# Altium PCB ProgrammingAdapter.PcbDoc
Units mm, origin at the board's own origin, x right, y up, seen from the top; angles counter-clockwise.
Board outline 16.2 x 7.93 mm, 4 copper layers (Top Layer, Layer 1, Layer 2, Bottom Layer), stack 1.683 mm thick; 4 components, 4 nets, 18 pads, 1 vias.
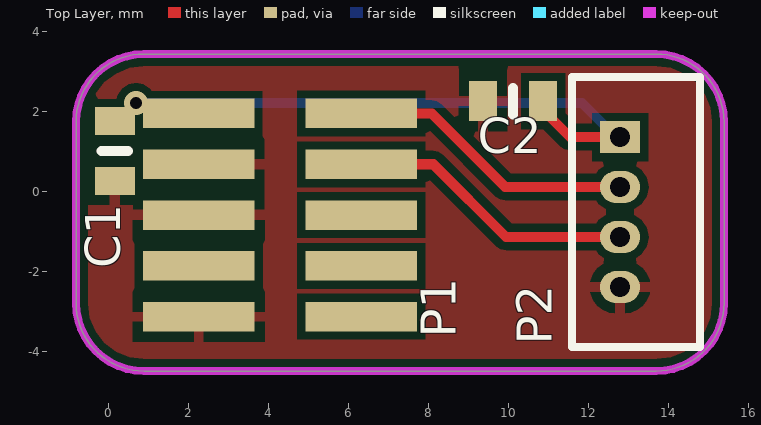
[diagram p0: Top Layer view]
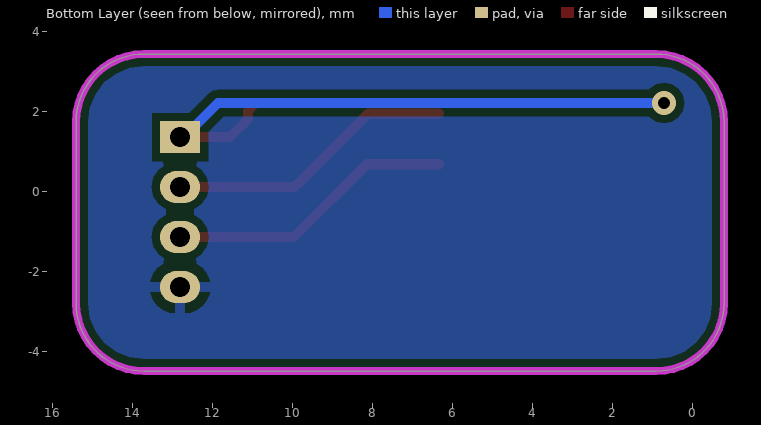
[diagram p1: Bottom Layer view, seen from below]
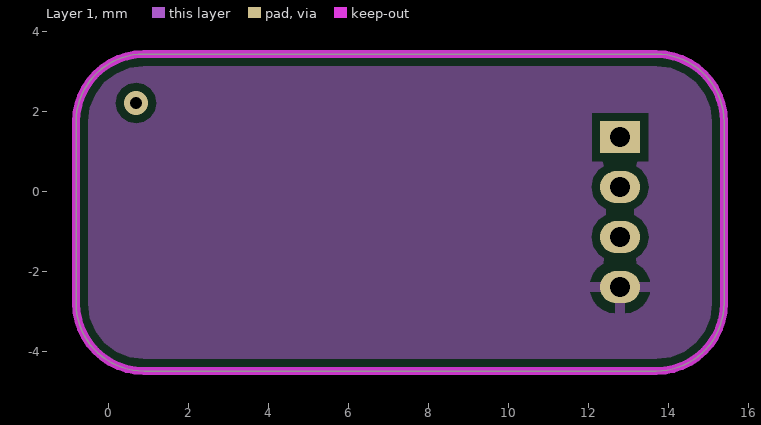
[diagram p2: Layer 1]
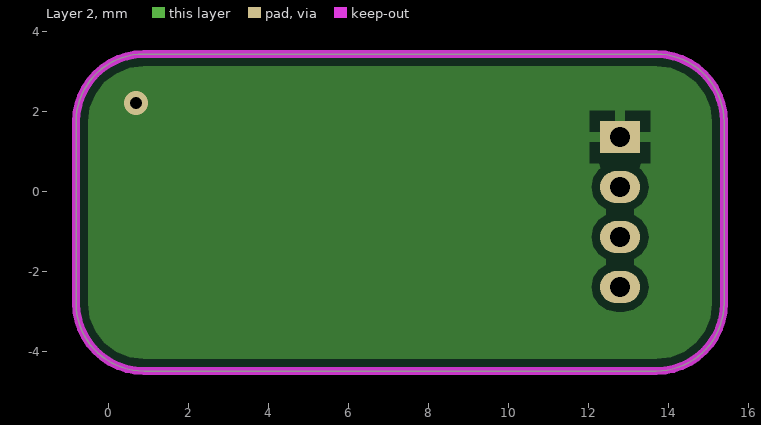
[diagram p3: Layer 2]

## Layer stack, top to bottom
Top Solder: solder mask 0.0102, Solder Resist, Dk 3.5
Top Layer: signal copper 0.0356
Dielectric 1: prepreg 0.0711, PP-006, Dk 4.1
Layer 1: signal copper 0.035
Dielectric1: core 1.4, FR-4, Dk 4.8
Layer 2: signal copper 0.035
Dielectric 2: prepreg 0.0711, PP-006, Dk 4.1
Bottom Layer: signal copper 0.0356
Bottom Solder: solder mask 0.0102, Solder Resist, Dk 3.5

## Board outline
-0.8,-2.8 -0.8,1.726 cw(c0.9,1.726) 0.9,3.426 13.7,3.426 cw(c13.7,1.726) 15.4,1.726 15.4,-2.8 cw(c13.7,-2.8) 13.7,-4.5 0.9,-4.5 cw(c0.9,-2.8)

## Design rules (kind name [scope] priority, off if disabled: settings)
Clearance [All] p1: gap=0.2 ignorepadtopadclearanceinfootprint=FALSE
DiffPairsRouting [All] p1: maxlimit=0.3 minlimit=0.2 mostfreqgap=0.2 toplayer_minwidth=0.2 toplayer_maxwidth=1 toplayer_prefwidth=0.2 midlayer1_minwidth=0.2 midlayer1_maxwidth=1 midlayer1_prefwidth=0.2 midlayer2_minwidth=0.2 midlayer2_maxwidth=1 midlayer2_prefwidth=0.2 bottomlayer_minwidth=0.2 bottomlayer_maxwidth=1 bottomlayer_prefwidth=0.2 maxuncoupledlength=12.7
HoleSize [All] p1: absolutevalues=TRUE maxlimit=10 minlimit=0.025 maxpercent=80.000 minpercent=20.000
MinimumSolderMaskSliver [All] p1: minsoldermaskwidth=0
PolygonConnect PolygonConnect_1 [(InComponentClass('All Components'))] p1: connectstyle=Relief reliefconductorwidth=0.254 reliefentries=4 polygonreliefangle="90 Angle" airgapwidth=0.254
PolygonConnect [All] p2: connectstyle=Direct reliefconductorwidth=0.254 reliefentries=4 polygonreliefangle="90 Angle" airgapwidth=0.254
RoutingVias [All] p1: holewidth=0.3 width=0.6 viastyle="Through Hole" minholewidth=0.3 minwidth=0.6 maxholewidth=1 maxwidth=2
SilkToSilkClearance [All] p1: silktosilkclearance=-10
SilkToSolderMaskClearance SilkscreenOverComponentPads [IsPad] p1: minsilkscreentomaskgap=-10 clearancetoexposedcopper=TRUE
SolderMaskExpansion [All] p1: expansion=0.102 istentingtop=FALSE
Width [All] p1: maxlimit=2 minlimit=0.2 preferedwidth=0.3
25 further rules are at their usual default settings.

## Components (designator, comment, footprint, x,y, rotation, side; value= is the part's Value field where it differs from the comment)
C1 "100n" 0603 0.17,1.003 r270 top
C2 "100n" 0603 10.126,2.248 r180 top
P1 "FTSH-105-01-F-DV" FTSH-105-01-F-DV-K 4.3,-0.6 r270 top
P2 "MHDR1X4" MOLEX_4_V 12.8,1.35 r270 top

## Footprints (in the part's own frame and the unit in brackets; to place one, negate y for a bottom-side part, rotate by r counter-clockwise, add the part's x,y. Pads: shape width x height; smd on the part's side, far side on the other; paste and mask are expansions set on the pad)
0603 [mm]
  rect 0.7x1 smd: 1(-0.75,0) 2(0.75,0)
  silkscreen extent 0,-0.33 0,0.33, body extent -0.85,-0.47 0.85,0.48, height 0.6
FTSH-105-01-F-DV-K [mil]
  rect 29x110 smd mask+2: 1(-100,-80) 2(-100,80) 3(-50,-80) 4(-50,80) 5(0,-80) 6(0,80) 7(50,-80) 8(50,80) 9(100,-80) 10(100,80)
  body extent -125,-115 125,115, height 241
MOLEX_4_V [mm]
  rect 0.8x1 hole 0.5: 1(0,0)
  oval 0.8x1 hole 0.5: 2(1.25,0) 3(2.5,0) 4(3.75,0)
  silkscreen extent -1.5,-1.2 5.25,2, body extent -1.5,-1.15 5.25,2.05, height 4.2

## Part data
C1 C2: library part "Cap 100nF", "Capacitor", LatestRevisionDate=17-Jul-2002, LatestRevisionNote="Re-released for DXP Platform.", Published=8-Jun-2000, Publisher="Altium Limited"
P1: library part "Header 5X2", "Header, 5-Pin, Dual row", Supplier Part Number 1=SAM13159CT-ND, LatestRevisionDate=17-Jul-2002, LatestRevisionNote="Re-released for DXP Platform.", Publisher="Altium Limited", Supplier 1=Digi-Key, Supplier 2=Mouser, Supplier Part Number 2=200-FTSH10501FDVKPTR
P2: "Header, 4-Pin", LatestRevisionDate=17-Jul-2002, LatestRevisionNote="Re-released for DXP Platform.", Publisher="Altium Limited"

## Via types
v1: diameter 0.6, hole 0.3, Top Layer to Bottom Layer, tented both sides, 1 vias

## Nets (pads, with @x,y where several pads share a name; then routed paths per layer and width w, separated by ;. In a path a pad name is that pad's centre, name@x,y a point inside that pad or via, vN(x,y) a via of type N, cw(c..) or ccw(c..) an arc to the next point about the centre after c; other vN are vias at no path point)
3V3: C1.1 C2.1 P1.1 P2.1 | length 14.7
  Top Layer w0.254: C2.1@11,2.1 11.099,2.001 11.099,1.801 11.55,1.35 P2.1
  Bottom Layer w0.254: v1@0.672,2.2 11.85,2.2 12.7,1.35 P2.1
  other v1: 0.7,2.2
GND: C1.2 C2.2 P1.3 P1.5 P1.9 P2.4
nRESET/SWDIO: P1.2 P2.2 | length 7.2
  Top Layer w0.254: P1.2 8.091,1.94 9.931,0.1 P2.2
SWD_CLK: P1.4 P2.3 | length 7.2
  Top Layer w0.254: P1.4 8.13,0.67 9.95,-1.15 P2.3
pads on no net: P1.6 P1.7 P1.8 P1.10

## Polygon pours and split planes (outlines as drawn)
3V3 on Layer 2 "3V3_L03_P002" (solid, pour order 2): -0.8,-2.8 -0.8,1.726 cw(c0.9,1.726) 0.9,3.426 13.7,3.426 cw(c13.7,1.726) 15.4,1.726 15.4,-2.8 cw(c13.7,-2.8) 13.7,-4.5 0.9,-4.5 cw(c0.9,-2.8)
GND on Top Layer "GND_L01_P000" (solid, pour order 0): -0.8,-2.8 -0.8,1.726 cw(c0.9,1.726) 0.9,3.426 13.7,3.426 cw(c13.7,1.726) 15.4,1.726 15.4,-2.8 cw(c13.7,-2.8) 13.7,-4.5 0.9,-4.5 cw(c0.9,-2.8)
GND on Layer 1 "GND_L02_P001" (solid, pour order 1): -0.8,-2.8 -0.8,1.726 cw(c0.9,1.726) 0.9,3.426 13.7,3.426 cw(c13.7,1.726) 15.4,1.726 15.4,-2.8 cw(c13.7,-2.8) 13.7,-4.5 0.9,-4.5 cw(c0.9,-2.8)
GND on Bottom Layer "GND_L04_P003" (solid, pour order 3): -0.8,-2.8 -0.8,1.726 cw(c0.9,1.726) 0.9,3.426 13.7,3.426 cw(c13.7,1.726) 15.4,1.726 15.4,-2.8 cw(c13.7,-2.8) 13.7,-4.5 0.9,-4.5 cw(c0.9,-2.8)

## Keep-outs
Keep-Out Layer:
  the board outline again, w0.2